# Altium PCB Master_Schematics.PcbDoc
Units mil, origin at the board's own origin, x right, y up, seen from the top; angles counter-clockwise.
Board outline 6000 x 4000 mil, 2 copper layers (Top Layer, Bottom Layer); 35 components, 38 nets, 463 pads, 0 vias.
Unrouted connection lines stored in the file: 74.
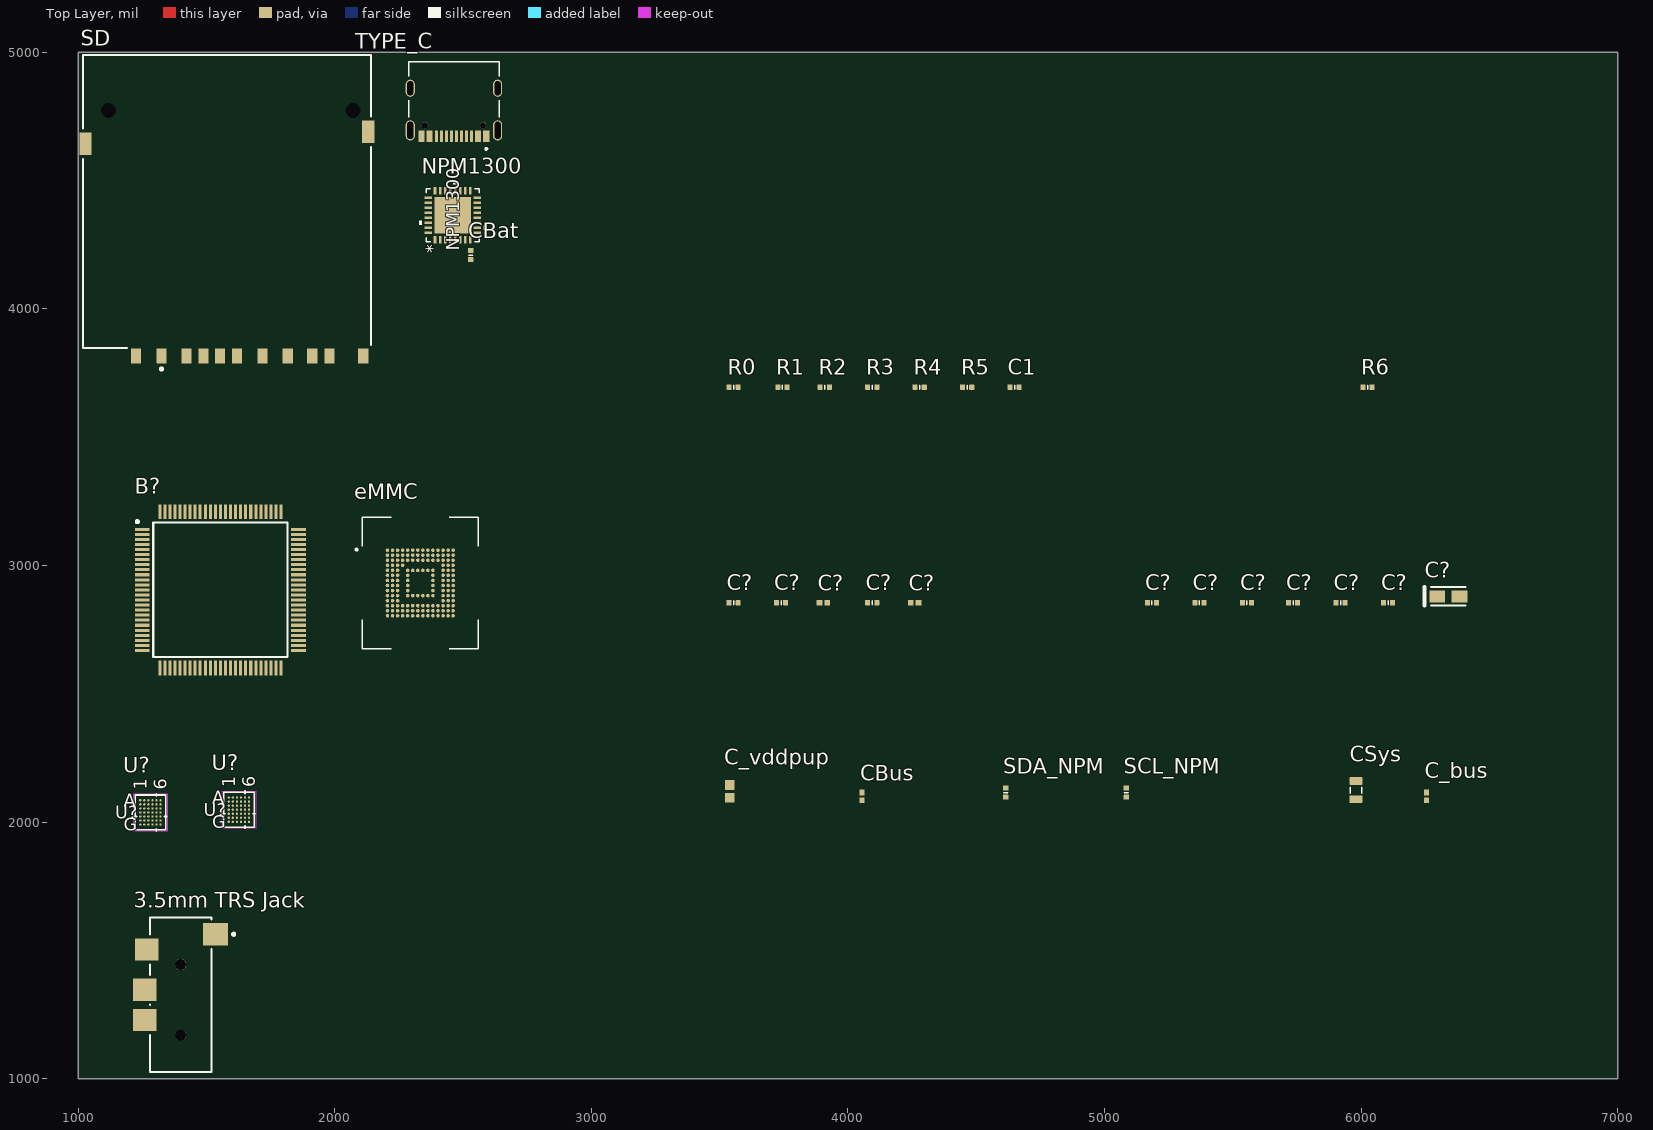
[diagram p0: Top Layer view]
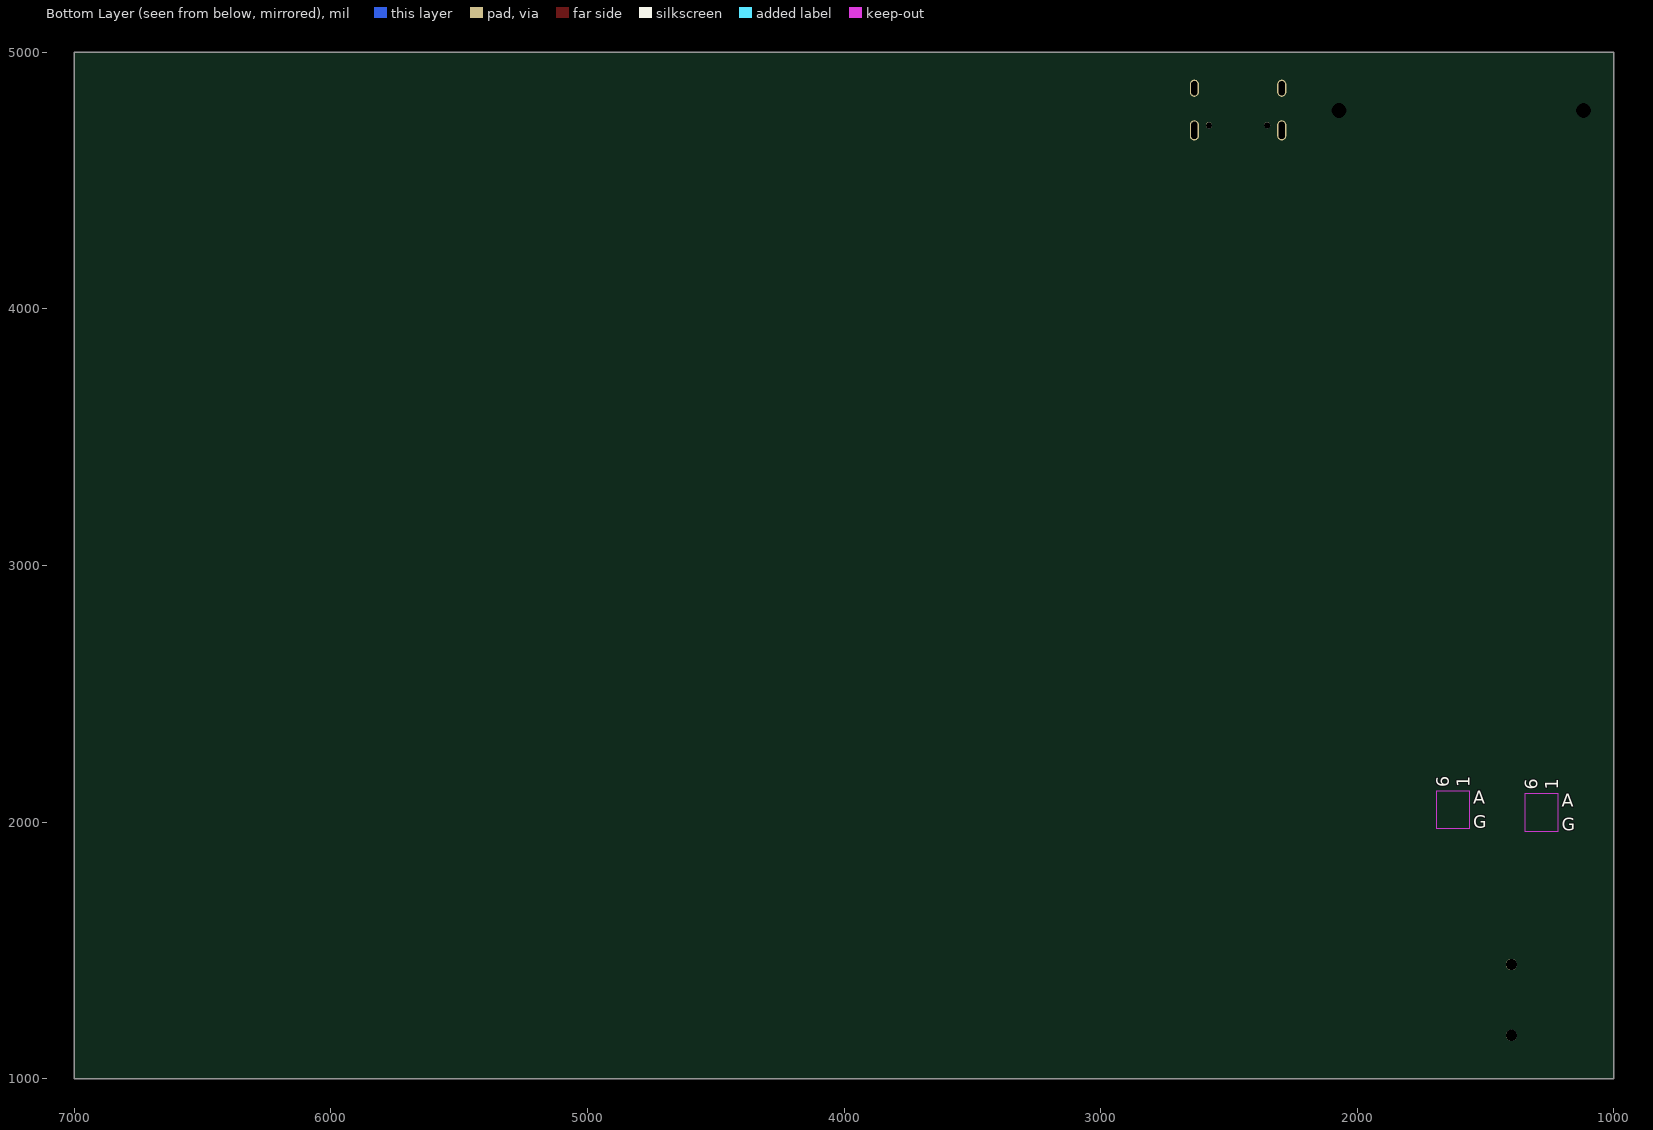
[diagram p1: Bottom Layer view, seen from below]

## Layer stack, top to bottom
Top Solder: solder mask 0.4, Solder Resist, Dk 3.5
Top Layer: signal copper 1.4
Dielectric 1: dielectric 12.6, FR-4, Dk 4.8
Bottom Layer: signal copper 1.4
Bottom Solder: solder mask 0.4, Solder Resist, Dk 3.5

## Board outline
1000,1000 7000,1000 7000,5000 1000,5000

## Design rules (kind name [scope] priority, off if disabled: settings)
Clearance [All] p1: gap=10 ignorepadtopadclearanceinfootprint=FALSE
PolygonConnect [All] p1: connectstyle=Relief reliefconductorwidth=10 reliefentries=4 polygonreliefangle="90 Angle" airgapwidth=10
RoutingVias [All] p1: holewidth=28 width=50 viastyle="Through Hole" minholewidth=28 minwidth=50 maxholewidth=28 maxwidth=50
SolderMaskExpansion [All] p1: expansion=0 istentingtop=FALSE
SupplyNets "Schematic Supply Nets_4" [InNet('VNET')] p1: voltage=0.000
SupplyNets "Schematic Supply Nets_3" [InNet('GND')] p2: voltage=0.000
SupplyNets "Schematic Supply Nets_2" [InNet('VDDIO')] p3: voltage=0.000
SupplyNets "Schematic Supply Nets_1" [InNet('VBUSIN')] p4: voltage=0.000
SupplyNets "Schematic Supply Nets" [InNet('VBAT')] p5: voltage=0.000
Width [All] p1: maxlimit=10 minlimit=10 preferedwidth=10
30 further rules are at their usual default settings.

## Classes and differential pairs
component class Designator: "3.5mm TRS Jack" U?

## Components (designator, comment, footprint, x,y, rotation, side; value= is the part's Value field where it differs from the comment)
"3.5mm TRS Jack" "SJ2-3574A-SMT-TR" FP-SJ2-3574A-SMT-TR-MFG 1400,1326.89 r90 top
B? "STM32H743VIT6" QFP50P1600X1600X160-100N 1555,2905 r0 top
C1 "Capacitor 100nF +/-20% 50V 0402" CAPC0402(1005)60_L 4650,3695 r0 top value=100nF
C? "Capacitor 1 uF +/- 10% 6.3 V 0402" CAPC1005X55X25LL05T10 3905,2855 r0 top value=1µF
C? "Capacitor 1 uF +/- 10% 6.3 V 0402" CAPC1005X55X25LL05T10 4260,2855 r0 top value=1µF
C? "Capacitor 100nF +/-20% 50V 0402" CAPC0402(1005)60_L 5370,2855 r0 top value=100nF
C? "Capacitor 100nF +/-20% 50V 0402" CAPC0402(1005)60_L 3740,2855 r0 top value=100nF
C? "Capacitor 100nF +/-20% 50V 0402" CAPC0402(1005)60_L 4095,2855 r0 top value=100nF
C? "Capacitor 100nF +/-20% 50V 0402" CAPC0402(1005)60_L 5185,2855 r0 top value=100nF
C? "Capacitor 100nF +/-20% 50V 0402" CAPC0402(1005)60_L 5555,2855 r0 top value=100nF
C? "Capacitor 100nF +/-20% 50V 0402" CAPC0402(1005)60_L 5920,2855 r0 top value=100nF
C? "Capacitor 100nF +/-20% 50V 0402" CAPC0402(1005)60_L 5735,2855 r0 top value=100nF
C? "Capacitor 100nF +/-20% 50V 0402" CAPC0402(1005)60_L 6105,2855 r0 top value=100nF
C? "Capacitor 100nF +/-20% 50V 0402" CAPC0402(1005)60_L 3555,2855 r0 top value=100nF
C? "TAJA475K016RNJ" AVX-TAJ-A-2_L 6340,2880 r0 top value=4.7µF
C_bus "Capacitor 1 uF +/- 10% 6.3 V 0402" CAPC1005X55X25LL05T10 6255,2100 r90 top value=1µF
C_vddpup "Capacitor 100 nF +/-10% 50 V 0603" CAPC1608X90X40NL10T20 3540,2120 r90 top value=100nF
CBat "Capacitor 2,2µF +/-20% 10V 0402" CAPC0402(1005)60_L 2530,4210 r90 top value=2.2µF
CBus "Capacitor 1 uF +/- 10% 6.3 V 0402" CAPC1005X55X25LL05T10 4055,2100 r90 top value=1µF
CSys "Capacitor 10µF +/-20% 25V 0805" CAPC0805(2012)145_L 5980,2125 r90 top value=10µF
eMMC "EMMC16G-TB29-90F01" BGA153N50P14X14_1300X1150X100N 2333.9,2932.05 r0 top
NPM1300 "NPM1300-QEAA-R7" QFN32_5X5_NOR 2460,4365 r90 top
R0 "10KR2F" RESC0402(1005)_L 3555,3695 r0 top value=10k
R1 "10KR2F" RESC0402(1005)_L 3745,3695 r0 top value=10k
R2 "10KR2F" RESC0402(1005)_L 3910,3695 r0 top value=10k
R3 "10KR2F" RESC0402(1005)_L 4095,3695 r0 top value=10k
R4 "10KR2F" RESC0402(1005)_L 4280,3695 r0 top value=10k
R5 "10KR2F" RESC0402(1005)_L 4465,3695 r0 top value=10k
R6 "10KR2F" RESC0402(1005)_L 6025,3695 r0 top value=10k
SCL_NPM "10KR2F" RESC0402(1005)_L 5085,2115 r90 top value=10k
SD "10067847-001RLF" FCI-10067847-001RLF_V 1580,4295 r180 top
SDA_NPM "10KR2F" RESC0402(1005)_L 4615,2115 r90 top value=10k
TYPE_C "TYPE-C-31-M-12" HRO_TYPE-C-31-M-12 2465,4860 r180 top
U? "CS43131-CWZR" WLCSP42_CS43131-CWZR_CIR 1627.13,2048.5 r0 top
U? "CS43131-CWZR" WLCSP42_CS43131-CWZR_CIR 1282.13,2037.76 r0 top

## Footprints (in the part's own frame and the unit in brackets; to place one, negate y for a bottom-side part, rotate by r counter-clockwise, add the part's x,y. Pads: shape width x height; smd on the part's side, far side on the other; paste and mask are expansions set on the pad)
AVX-TAJ-A-2_L [mm] "Molded Capacitor, 2-Leads, Body 3.4x1.8mm, IPC High Density"
  rect 1.55x1.2 smd: 1(-1.1,0) 2(1.1,0)
  silkscreen extent -2.37,-0.9 1.7,0.9, body extent -1.92,-0.9 1.92,0.9, height 1.8
BGA153N50P14X14_1300X1150X100N [mm]
  round 0.35 smd paste+0 mask+0.025: A1(-3.25,3.25) A2(-2.75,3.25) A3(-2.25,3.25) A4(-1.75,3.25) A5(-1.25,3.25) A6(-0.75,3.25) A7(-0.25,3.25) A8(0.25,3.25) A9(0.75,3.25) A10(1.25,3.25) A11(1.75,3.25) A12(2.25,3.25) A13(2.75,3.25) A14(3.25,3.25) B1(-3.25,2.75) B2(-2.75,2.75) B3(-2.25,2.75) B4(-1.75,2.75) B5(-1.25,2.75) B6(-0.75,2.75) B7(-0.25,2.75) B8(0.25,2.75) B9(0.75,2.75) B10(1.25,2.75) B11(1.75,2.75) B12(2.25,2.75) B13(2.75,2.75) B14(3.25,2.75) C1(-3.25,2.25) C2(-2.75,2.25) C3(-2.25,2.25) C4(-1.75,2.25) C5(-1.25,2.25) C6(-0.75,2.25) C7(-0.25,2.25) C8(0.25,2.25) C9(0.75,2.25) C10(1.25,2.25) C11(1.75,2.25) C12(2.25,2.25) C13(2.75,2.25) C14(3.25,2.25) D1(-3.25,1.75) D2(-2.75,1.75) D3(-2.25,1.75) D4(-1.75,1.75) D12(2.25,1.75) D13(2.75,1.75) D14(3.25,1.75) E1(-3.25,1.25) E2(-2.75,1.25) E3(-2.25,1.25) E5(-1.25,1.25) E6(-0.75,1.25) E7(-0.25,1.25) E8(0.25,1.25) E9(0.75,1.25) E10(1.25,1.25) E12(2.25,1.25) E13(2.75,1.25) E14(3.25,1.25) F1(-3.25,0.75) F2(-2.75,0.75) F3(-2.25,0.75) F5(-1.25,0.75) F10(1.25,0.75) F12(2.25,0.75) F13(2.75,0.75) F14(3.25,0.75) G1(-3.25,0.25) G2(-2.75,0.25) G3(-2.25,0.25) G5(-1.25,0.25) G10(1.25,0.25) G12(2.25,0.25) G13(2.75,0.25) G14(3.25,0.25) H1(-3.25,-0.25) H2(-2.75,-0.25) H3(-2.25,-0.25) H5(-1.25,-0.25) H10(1.25,-0.25) H12(2.25,-0.25) H13(2.75,-0.25) H14(3.25,-0.25) J1(-3.25,-0.75) J2(-2.75,-0.75) J3(-2.25,-0.75) J5(-1.25,-0.75) J10(1.25,-0.75) J12(2.25,-0.75) J13(2.75,-0.75) J14(3.25,-0.75) K1(-3.25,-1.25) K2(-2.75,-1.25) K3(-2.25,-1.25) K5(-1.25,-1.25) K6(-0.75,-1.25) K7(-0.25,-1.25) K8(0.25,-1.25) K9(0.75,-1.25) K10(1.25,-1.25) K12(2.25,-1.25) K13(2.75,-1.25) K14(3.25,-1.25) L1(-3.25,-1.75) L2(-2.75,-1.75) L3(-2.25,-1.75) L12(2.25,-1.75) L13(2.75,-1.75) L14(3.25,-1.75) M1(-3.25,-2.25) M2(-2.75,-2.25) M3(-2.25,-2.25) M4(-1.75,-2.25) M5(-1.25,-2.25) M6(-0.75,-2.25) M7(-0.25,-2.25) M8(0.25,-2.25) M9(0.75,-2.25) M10(1.25,-2.25) M11(1.75,-2.25) M12(2.25,-2.25) M13(2.75,-2.25) M14(3.25,-2.25) N1(-3.25,-2.75) N2(-2.75,-2.75) N3(-2.25,-2.75) N4(-1.75,-2.75) N5(-1.25,-2.75) N6(-0.75,-2.75) N7(-0.25,-2.75) N8(0.25,-2.75) N9(0.75,-2.75) N10(1.25,-2.75) N11(1.75,-2.75) N12(2.25,-2.75) N13(2.75,-2.75) N14(3.25,-2.75) P1(-3.25,-3.25) P2(-2.75,-3.25) P3(-2.25,-3.25) P4(-1.75,-3.25) P5(-1.25,-3.25) P6(-0.75,-3.25) P7(-0.25,-3.25) P8(0.25,-3.25) P9(0.75,-3.25) P10(1.25,-3.25) P11(1.75,-3.25) P12(2.25,-3.25) P13(2.75,-3.25) P14(3.25,-3.25)
  silkscreen extent -6.4,-6.5 5.75,6.5, body extent -5.75,-6.5 5.75,6.5, height 1
CAPC0402(1005)60_L [mm] "Chip Capacitor, Body 1.0x0.5mm, Height 0.6mm, IPC High Density"
  rrect25% 0.5x0.55 smd: 1(-0.45,0) 2(0.45,0)
  silkscreen extent 0,-0.2 0,0.2, body extent -0.5,-0.25 0.5,0.25, height 0.6
CAPC0805(2012)145_L [mm] "Chip Capacitor, Body 2.0x1.2mm, Height 1.45mm, IPC High Density"
  rrect25% 0.76x1.3 smd: 1(-0.9,0) 2(0.89,0)
  silkscreen extent -0.3,-0.55 0.3,0.55, body extent -1,-0.6 1,0.6, height 1.45
CAPC1005X55X25LL05T10 [mm] "Chip Capacitor, 2-Leads, Body 1.05x0.55mm, IPC High Density"
  rect 0.56x0.52 smd: 1(-0.39,0) 2(0.39,0)
  body extent -0.53,-0.28 0.53,0.28, height 0.55
CAPC1608X90X40NL10T20 [mm] "Chip Capacitor, 2-Leads, Body 1.70x0.90mm, IPC Medium Density"
  rect 0.95x0.95 smd: 1(-0.625,0) 2(0.625,0)
  body extent -0.85,-0.45 0.85,0.45, height 0.9
FCI-10067847-001RLF_V [mm] "CONN, 11-Leads, Body 29x28.5mm"
  rect 1x1.5 smd: 1(6.475,12.15) 2(3.975,12.15) 3(0.675,12.15) 4(-1.025,12.15) 5(-3.525,12.15) 6(-6.025,12.15) 7(-8.45,12.15) 8(-10.15,12.15) 9(8.975,12.15) 10(2.325,12.15) 11(-13.5,12.15)
  rect 1.2x2.2 smd: 12(-14,-10.05) 13(14,-8.85)
  round 0 hole 1.5 unplated: MH1(-12.5,-12.15) MH2(11.7,-12.15)
  silkscreen extent -14.25,-17.65 14.25,13.57, body extent -14.24,-17.7 14.21,12.56, height 2.9
FP-SJ2-3574A-SMT-TR-MFG [mm]
  rect 2.2x2.5 smd paste+0 mask+0: 1(6,-3.45)
  rect 2.2x2.3 smd paste+0 mask+0: 2(4.5,3.35) 3(0.5,3.55) 4(-2.5,3.55)
  round 1.1 hole 1.1 unplated paste-2539.97 mask+0: ""(-4,0) ""(3,0)
  silkscreen extent -7.65,-5.38 7.65,3.05, body extent -7.75,-4.8 7.75,4.8, height 0.25
HRO_TYPE-C-31-M-12 [mm]
  rect 0.6x1.14 smd mask+0.05: A1_B12(-3.2,4.75) A4_B9(-2.4,4.75) B1_A12(3.2,4.75) B4_A9(2.4,4.75)
  rect 0.3x1.14 smd mask+0.05: A5(-1.25,4.75) A6(-0.25,4.75) A7(0.25,4.75) A8(1.25,4.75) B5(1.75,4.75) B6(0.75,4.75) B7(-0.75,4.75) B8(-1.75,4.75)
  oval 0.9x2 hole 0.6 slot 1.7 at 90 deg: S1(-4.325,4.17) S2(4.325,4.17)
  oval 0.9x1.7 hole 0.6 slot 1.4 at 90 deg: S3(-4.325,0) S4(4.325,0)
  round 0.6 hole 0.6 unplated: ""(-2.89,3.68) ""(2.89,3.68)
  silkscreen extent -4.47,-2.6 4.47,6.1, body extent -4.47,-2.6 4.47,5.31, height 3.31
QFN32_5X5_NOR [mil]
  rect 30x10 smd paste+0 mask+0: 1(-95.5,68.9) 2(-95.5,49.21) 3(-95.5,29.53) 4(-95.5,9.84) 5(-95.5,-9.84) 6(-95.5,-29.53) 7(-95.5,-49.21) 8(-95.5,-68.9) 17(95.5,-68.9) 18(95.5,-49.21) 19(95.5,-29.53) 20(95.5,-9.84) 21(95.5,9.84) 22(95.5,29.53) 23(95.5,49.21) 24(95.5,68.9)
  rect 10x30 smd paste+0 mask+0: 9(-68.9,-95.5) 10(-49.21,-95.5) 11(-29.53,-95.5) 12(-9.84,-95.5) 13(9.84,-95.5) 14(29.53,-95.5) 15(49.21,-95.5) 16(68.9,-95.5) 25(68.9,95.5) 26(49.21,95.5) 27(29.53,95.5) 28(9.84,95.5) 29(-9.84,95.5) 30(-29.53,95.5) 31(-49.21,95.5) 32(-68.9,95.5)
  rect 142x142 smd paste-71 mask+0: 33(0,0)
  silkscreen extent -104,-130 130,130, body extent -99,-99 99,99, height 35
QFP50P1600X1600X160-100N [mm]
  rect 1.475x0.3 smd: 1(-7.738,6) 2(-7.738,5.5) 3(-7.738,5) 4(-7.738,4.5) 5(-7.738,4) 6(-7.738,3.5) 7(-7.738,3) 8(-7.738,2.5) 9(-7.738,2) 10(-7.738,1.5) 11(-7.738,1) 12(-7.738,0.5) 13(-7.738,0) 14(-7.738,-0.5) 15(-7.738,-1) 16(-7.738,-1.5) 17(-7.738,-2) 18(-7.738,-2.5) 19(-7.738,-3) 20(-7.738,-3.5) 21(-7.738,-4) 22(-7.738,-4.5) 23(-7.738,-5) 24(-7.738,-5.5) 25(-7.738,-6) 51(7.738,-6) 52(7.738,-5.5) 53(7.738,-5) 54(7.738,-4.5) 55(7.738,-4) 56(7.738,-3.5) 57(7.738,-3) 58(7.738,-2.5) 59(7.738,-2) 60(7.738,-1.5) 61(7.738,-1) 62(7.738,-0.5) 63(7.738,0) 64(7.738,0.5) 65(7.738,1) 66(7.738,1.5) 67(7.738,2) 68(7.738,2.5) 69(7.738,3) 70(7.738,3.5) 71(7.738,4) 72(7.738,4.5) 73(7.738,5) 74(7.738,5.5) 75(7.738,6)
  rect 0.3x1.475 smd: 26(-6,-7.738) 27(-5.5,-7.738) 28(-5,-7.738) 29(-4.5,-7.738) 30(-4,-7.738) 31(-3.5,-7.738) 32(-3,-7.738) 33(-2.5,-7.738) 34(-2,-7.738) 35(-1.5,-7.738) 36(-1,-7.738) 37(-0.5,-7.738) 38(0,-7.738) 39(0.5,-7.738) 40(1,-7.738) 41(1.5,-7.738) 42(2,-7.738) 43(2.5,-7.738) 44(3,-7.738) 45(3.5,-7.738) 46(4,-7.738) 47(4.5,-7.738) 48(5,-7.738) 49(5.5,-7.738) 50(6,-7.738) 76(6,7.738) 77(5.5,7.738) 78(5,7.738) 79(4.5,7.738) 80(4,7.738) 81(3.5,7.738) 82(3,7.738) 83(2.5,7.738) 84(2,7.738) 85(1.5,7.738) 86(1,7.738) 87(0.5,7.738) 88(0,7.738) 89(-0.5,7.738) 90(-1,7.738) 91(-1.5,7.738) 92(-2,7.738) 93(-2.5,7.738) 94(-3,7.738) 95(-3.5,7.738) 96(-4,7.738) 97(-4.5,7.738) 98(-5,7.738) 99(-5.5,7.738) 100(-6,7.738)
  silkscreen extent -8.35,-6.65 6.65,6.87
RESC0402(1005)_L [mm] "Chip Resistor, Body 1.0x0.5mm, IPC High Density"
  rrect25% 0.5x0.55 smd: 1(-0.45,0) 2(0.45,0)
  silkscreen extent 0,-0.2 0,0.2, body extent -0.5,-0.25 0.5,0.25, height 0.3
WLCSP42_CS43131-CWZR_CIR [mil]
  round 9 smd paste+0 mask+0: A1(-39.37,47.24) A2(-23.62,47.24) A3(-7.87,47.24) A4(7.87,47.24) A5(23.62,47.24) A6(39.37,47.24) B1(-39.37,31.5) B2(-23.62,31.5) B3(-7.87,31.5) B4(7.87,31.5) B5(23.62,31.5) B6(39.37,31.5) C1(-39.37,15.75) C2(-23.62,15.75) C3(-7.87,15.75) C4(7.87,15.75) C5(23.62,15.75) C6(39.37,15.75) D1(-39.37,0) D2(-23.62,0) D3(-7.87,0) D4(7.87,0) D5(23.62,0) D6(39.37,0) E1(-39.37,-15.75) E2(-23.62,-15.75) E3(-7.87,-15.75) E4(7.87,-15.75) E5(23.62,-15.75) E6(39.37,-15.75) F1(-39.37,-31.5) F2(-23.62,-31.5) F3(-7.87,-31.5) F4(7.87,-31.5) F5(23.62,-31.5) F6(39.37,-31.5) G1(-39.37,-47.24) G2(-23.62,-47.24) G3(-7.87,-47.24) G4(7.87,-47.24) G5(23.62,-47.24) G6(39.37,-47.24)
  Keep-Out Layer region: -64.74,-72.62 -64.74,72.62 64.74,72.62 64.74,-72.62
  silkscreen extent -64,-73 64,73, body extent -54,-63 54,63, height 21

## Part data
"3.5mm TRS Jack": library part CMP-14818-000001-1, "AUDIO JACK, 3.5 MM, RT, 4 CONDUC", Current Rating=1A, Manufacturer=CUI, Temperature="-25°C to +85°C", Temperature Range High=+85°C, Temperature Range Low=-25°C, Voltage Rating=12V, Automotive=No, Category=Conn, ComponentLink2Description=Datasheet, ComponentLink2URL=https://www.cui.com/product/resource/sj2-357x-smt.pdf, Conn Orientation=Horizontal, Contact Material=Silver, Device Class L1=Connectors, Device Class L2="Audio / Video Connectors", Device Class L3=unset, Digikey Description="AUDIO JACK, 3.5 MM, RT, 4 CONDUC", Height=5.3mm, Lead Free=Yes, Manufacturer Part Number=SJ2-3574A-SMT-TR, Number Of Contacts=4, Octopart=https://octopart.com/sj2-3574a-smt-tr-cui-77838840, Package=SJ2-3574A-SMT-TR, RoHS=TRUE
B?: library part CMP-060-000000-1, "ARM Microcontrollers - MCU High-performance and DSP with DP-FPU, ARM Cortex-M7 MCU with 2MBytes Flash, 1MB RAM, 400 MHz CPU, Art Accelerator, L1 cache, external memory interface, large set of peripherals", Manufacturer_Name=STMicroelectronics, Datasheet Link=https://www.st.com/resource/en/datasheet/stm32h743vi.pdf, Design Item ID=STM32H743VIT6, Geometry.Height=1.6mm, Manufacturer_Part_Number=STM32H743VIT6, Source=STM32H743VIT6.SchLib
C1 C? C? C? C? C? C? C? C? C?: library part CMP-001-00067-3, "Chip Capacitor, 100nF +/-20%, 50V, 0402, Thickness 0.6 mm", Case/Package=0402, Max Operating Temperature=85°C, Min Operating Temperature=-55°C, Tolerance=10%, Voltage Rating=50V, Mounting Technology=SMT, Pins=2
C? C? C_bus CBus: library part CMP-001-00008-6, "Chip Capacitor, 1 uF, +/- 10%, 6.3 V, 0402 (1005 Metric)", Capacitor Type=Ceramic, Case/Package=0402, Max Operating Temperature=85°C, Min Operating Temperature=-55°C, Tolerance=10%, Voltage Rating=6.3V, Mounting Technology=SM, Pins=2, RoHS Compliant=True
C?: library part CMP-001-00042-7, "Standard Tantalum, 4.7 uF, +/- 10%, 16 V, -55 to 125 degC, 1206 (3216 Metric), RoHS, Tape and Reel", Capacitor Type=Tantalum, Case/Package=1206, Manufacturer=AVX, Max Operating Temperature=125°C, Min Operating Temperature=-55°C, Package Description="2-Pin Surface Mount Device, Body 3.2 x 1.65 mm", Package Quantity=2000, Package Reference=TAJ-A-2, Resistance=4Ohm, Tolerance=10%, Voltage Rating=16V, Datasheet URL=http://datasheets.avx.com/TAJ.pdf, Datasheet Version=Feb-16, ESR=4Ohm, Manufacturer URL=http://www.avx.com/, Mounting Technology=SM, Packaging=TapeandReel, Pins=2, RoHS Compliant=True
C_vddpup: library part CMP-001-00017-6, "Chip Capacitor, 100 nF, +/- 10%, 50 V, 0603 (1608 Metric)", Capacitor Type=Ceramic, Case/Package=0603, Max Operating Temperature=125°C, Min Operating Temperature=-55°C, Tolerance=10%, Voltage Rating=50V, Mounting Technology=SM, Pins=2, RoHS Compliant=True
CBat: library part CMP-001-00056-4, "Chip Capacitor, 2,2µF +/-20%, 10V, 0402, Thickness 0.6 mm", Case/Package=0402, Max Operating Temperature=85°C, Min Operating Temperature=-55°C, Tolerance=10%, Voltage Rating=10V, Mounting Technology=SMT, Pins=2
CSys: library part CMP-001-00079-4, "Chip Capacitor, 10µF +/-20%, 25V, 0805, Thickness 1.45 mm", Case/Package=0805, Max Operating Temperature=85°C, Min Operating Temperature=-55°C, Tolerance=10%, Voltage Rating=25V, Mounting Technology=SMT, Pins=2
eMMC: library part CMP-054-000000-1, "eMMC 5.1 (HS400) 153B 16GB", Package=None, Check_prices=https://www.snapeda.com/parts/EMMC16G-TB29-90F01/Kingston/view-part/?ref=eda, Component Type=Standard, Design Item ID=EMMC16G-TB29-90F01, MF=Kingston, MP=EMMC16G-TB29-90F01, Pin Count=153, SnapEDA_Link=https://www.snapeda.com/parts/EMMC16G-TB29-90F01/Kingston/view-part/?ref=snap, Source=EMMC16G-TB29-90F01.SchLib
NPM1300: library part CMP-052-000000-1, "Description", Manufacturer_Name="Nordic Semiconductor", Copyright="Copyright (C) 2026 Ultra Librarian. All rights reserved.", Design Item ID=NPM1300-QEAA-R7, Manufacturer_Part_Number=NPM1300-QEAA-R7, RefDes=RefDes, Source=NPM1300-QEAA-R7.SchLib, Type=Type
R0 R1 R2 R3 R4 R5 R6 SCL_NPM SDA_NPM: library part CMP-009-00066-2, "10K 0.063W 1% 0402 (1005 Metric)  SMD", Case/Package=0402, Power=63mW, Tolerance=1%, Mounting Technology=SMT, Pins=2
SD: library part CMP-2000-05818-1, "Assembly SD Card Reader, Famale, 11 Way, -40 to 105 degC, RoHS, Tape and Reel", Manufacturer="FCI Electronics", Package Description="11-Pin Surface Mount Device, Body 29 x 28.5 mm", Connector Type=MemoryCard, Contact Material=CopperAlloy, Contact Plating=GoldPlatedContacts, Datasheet URL=https://datasheet.ciiva.com/1106/10067847-1106690.pdf, Datasheet Version="Rev. K, 09/2014", Manufacturer URL=http://portal.fciconnect.com/, Mounting Technology=SurfaceMount, No. of Contacts=11Contacts, Package Reference=10067847-001RLF, Product Range=-, SVHC=NoSVHC(15-Jun-2015)
TYPE_C: library part CMP-027-000000-1, "USB Connectors 24 Receptacle 1 8.94*7.3mm RoHS", Package=Package, Check_prices=https://www.snapeda.com/parts/TYPE-C-31-M-12/HRO+Electronics+Co.%252C+Ltd./view-part/?ref=eda, Component Type=Standard, Design Item ID=TYPE-C-31-M-12, MF="HRO Electronics Co., Ltd.", MP=TYPE-C-31-M-12, Pin Count=16, SnapEDA_Link=https://www.snapeda.com/parts/TYPE-C-31-M-12/HRO+Electronics+Co.%252C+Ltd./view-part/?ref=snap, Source=TYPE-C-31-M-12.SchLib
U? U?: library part CMP-057-000000-1, "Description", Manufacturer_Name="Cirrus Logic", Copyright="Copyright (C) 2025 Ultra Librarian. All rights reserved.", Design Item ID=CS43131-CWZR, Manufacturer_Part_Number=CS43131-CWZR, RefDes=RefDes, Source=CS43131-CWZR.SchLib, Type=Type

## Nets (pads, with @x,y where several pads share a name; then routed paths per layer and width w, separated by ;. In a path a pad name is that pad's centre, name@x,y a point inside that pad or via, vN(x,y) a via of type N, cw(c..) or ccw(c..) an arc to the next point about the centre after c; other vN are vias at no path point)
CBUS_V: C_bus.1 NPM1300.22
CC1: NPM1300.23 TYPE_C.A5
CC2: NPM1300.24 TYPE_C.B5
GND: C1.2 C_bus.2 C_vddpup.1 CBat.2 CBus.1 CSys.1 eMMC.A6 eMMC.C4 eMMC.E7 eMMC.G5 eMMC.H10 eMMC.J5 eMMC.K8 eMMC.N2 eMMC.N5 eMMC.P4 eMMC.P6 NPM1300.2 NPM1300.6 NPM1300.18 NPM1300.28 NPM1300.29 NPM1300.30 NPM1300.31 NPM1300.33 SD.3 SD.6 SD.11 SD.12 SD.13 TYPE_C.A1_B12 TYPE_C.A8 TYPE_C.B1_A12 TYPE_C.B8 TYPE_C.S1 TYPE_C.S2 TYPE_C.S3 TYPE_C.S4
NetB?_16: B?.16
NetB?_22: B?.22
NetB?_53: B?.53
NetB?_54: B?.54
NetB?_65: B?.65
NetB?_66: B?.66
NetB?_78: B?.78
NetB?_79: B?.79
NetB?_80: B?.80
NetB?_83: B?.83
NetB?_89: B?.89
NetB?_90: B?.90
NeteMMC_A3: eMMC.A3
NeteMMC_A4: eMMC.A4
NeteMMC_A5: eMMC.A5
NeteMMC_B2: eMMC.B2
NeteMMC_K5: eMMC.K5
NeteMMC_M5: eMMC.M5
NeteMMC_M6: eMMC.M6
NetNPM1300_13: NPM1300.13 SDA_NPM.2
NetNPM1300_14: NPM1300.14 SCL_NPM.2
NetR3_2: R3.2 SD.5
NetR6_1: R6.1 SD.10
SD_CMD: R4.2 SD.2
SD_DAT0: R2.2 SD.7
SD_DAT1: R1.2 SD.8
SD_DAT2: R0.2 SD.9
SD_DAT3: R5.2 SD.1
V1V8: eMMC.C6 eMMC.M4 eMMC.N4 eMMC.P3 eMMC.P5 R6.2
V3V3: C1.1 eMMC.E6 eMMC.F5 eMMC.J10 eMMC.K9 R0.1 R1.1 R2.1 R3.1 R4.1 R5.1 SD.4
VBAT: CBat.1 NPM1300.19
VBUSIN: CBus.2 NPM1300.21
VDDIO: C_vddpup.2 NPM1300.12 SCL_NPM.1 SDA_NPM.1
VNET: CSys.2 NPM1300.1 NPM1300.4 NPM1300.20 NPM1300.32
pads on no net: "3.5mm TRS Jack.1" "3.5mm TRS Jack.2" "3.5mm TRS Jack.3" "3.5mm TRS Jack.4" "3.5mm TRS Jack." B?.1 B?.2 B?.3 B?.4 B?.5 B?.6 B?.7 B?.8 B?.9 B?.10 B?.11 B?.12 B?.13 B?.14 B?.15 B?.17 B?.18 B?.19 B?.20 B?.21 B?.23 B?.24 B?.25 B?.26 B?.27 B?.28 B?.29 B?.30 B?.31 B?.32 B?.33 B?.34 B?.35 B?.36 B?.37 B?.38 B?.39 B?.40 B?.41 B?.42 B?.43 B?.44 B?.45 B?.46 B?.47 B?.48 B?.49 B?.50 B?.51 B?.52 B?.55 B?.56 B?.57 B?.58 B?.59 B?.60 B?.61 B?.62 B?.63 B?.64 B?.67 B?.68 B?.69 B?.70 B?.71 B?.72 B?.73 B?.74 B?.75 B?.76 B?.77 B?.81 B?.82 B?.84 B?.85 B?.86 B?.87 B?.88 B?.91 B?.92 B?.93 B?.94 B?.95 B?.96 B?.97 B?.98 B?.99 B?.100 C?.1 C?.2 eMMC.A1 eMMC.A2 eMMC.A7 eMMC.A8 eMMC.A9 eMMC.A10 eMMC.A11 eMMC.A12 eMMC.A13 eMMC.A14 eMMC.B1 eMMC.B3 eMMC.B4 eMMC.B5 eMMC.B6 eMMC.B7 eMMC.B8 eMMC.B9 eMMC.B10 eMMC.B11 eMMC.B12 eMMC.B13 eMMC.B14 eMMC.C1 eMMC.C2 eMMC.C3 eMMC.C5 eMMC.C7 eMMC.C8 eMMC.C9 eMMC.C10 eMMC.C11 eMMC.C12 eMMC.C13 eMMC.C14 eMMC.D1 eMMC.D2 eMMC.D3 eMMC.D4 eMMC.D12 eMMC.D13 eMMC.D14 eMMC.E1 eMMC.E2 eMMC.E3 eMMC.E5 eMMC.E8 eMMC.E9 eMMC.E10 eMMC.E12 eMMC.E13 eMMC.E14 eMMC.F1 eMMC.F2 eMMC.F3 eMMC.F10 eMMC.F12 eMMC.F13 eMMC.F14 eMMC.G1 eMMC.G2 eMMC.G3 eMMC.G10 eMMC.G12 eMMC.G13 eMMC.G14 eMMC.H1 eMMC.H2 eMMC.H3 eMMC.H5 eMMC.H12 eMMC.H13 eMMC.H14 eMMC.J1 eMMC.J2 eMMC.J3 eMMC.J12 eMMC.J13 eMMC.J14 eMMC.K1 eMMC.K2 eMMC.K3 eMMC.K6 eMMC.K7 eMMC.K10 eMMC.K12 eMMC.K13 eMMC.K14 eMMC.L1 eMMC.L2 eMMC.L3 eMMC.L12 eMMC.L13 eMMC.L14 eMMC.M1 eMMC.M2 eMMC.M3 eMMC.M7 eMMC.M8 eMMC.M9 eMMC.M10 eMMC.M11 eMMC.M12 eMMC.M13 eMMC.M14 eMMC.N1 eMMC.N3 eMMC.N6 eMMC.N7 eMMC.N8 eMMC.N9 eMMC.N10 eMMC.N11 eMMC.N12 eMMC.N13 eMMC.N14 eMMC.P1 eMMC.P2 eMMC.P7 eMMC.P8 eMMC.P9 eMMC.P10 eMMC.P11 eMMC.P12 eMMC.P13 eMMC.P14 NPM1300.3 NPM1300.5 NPM1300.7 NPM1300.8 NPM1300.9 NPM1300.10 NPM1300.11 NPM1300.15 NPM1300.16 NPM1300.17 NPM1300.25 NPM1300.26 NPM1300.27 SD.MH1 SD.MH2 TYPE_C. TYPE_C.A4_B9 TYPE_C.A6 TYPE_C.A7 TYPE_C.B4_A9 TYPE_C.B6 TYPE_C.B7 U?.A1 U?.A2 U?.A3 U?.A4 U?.A5 U?.A6 U?.B1 U?.B2 U?.B3 U?.B4 U?.B5 U?.B6 U?.C1 U?.C2 U?.C3 U?.C4 U?.C5 U?.C6 U?.D1 U?.D2 U?.D3 U?.D4 U?.D5 U?.D6 U?.E1 U?.E2 U?.E3 U?.E4 U?.E5 U?.E6 U?.F1 U?.F2 U?.F3 U?.F4 U?.F5 U?.F6 U?.G1 U?.G2 U?.G3 U?.G4 U?.G5 U?.G6

## Text inside footprints (layer, text, board x,y; h text height)
NPM1300: Top 3D Body "*" at 2406.26,4272 h50 r90; Top Overlay "*" at 2406.26,4217 h50 r90
TYPE_C: Top 3D Body "PCB EDGE" at 2260.28,4934.8 h24 r180
U?: Top 3D Body "A" at 1178.13,2060 h50; Top 3D Body "G" at 1178.13,1965.51 h50; Top 3D Body "1" at 1267.76,2125.76 h50 r90; Top 3D Body "6" at 1346.5,2125.76 h50 r90; Top Overlay "A" at 1178.13,2060 h50; Top Overlay "G" at 1178.13,1965.51 h50; Top Overlay "1" at 1267.76,2125.76 h50 r90; Top Overlay "6" at 1346.5,2125.76 h50 r90; Bottom Overlay "A" at 1203.13,2060 h50; Bottom Overlay "G" at 1203.13,1965.51 h50; Bottom Overlay "1" at 1217.76,2125.76 h50 r270; Bottom Overlay "6" at 1296.5,2125.76 h50 r270
U?: Top 3D Body "6" at 1691.5,2136.5 h50 r90; Top 3D Body "1" at 1612.76,2136.5 h50 r90; Top 3D Body "G" at 1523.13,1976.26 h50; Top 3D Body "A" at 1523.13,2070.75 h50; Top Overlay "6" at 1691.5,2136.5 h50 r90; Top Overlay "1" at 1612.76,2136.5 h50 r90; Top Overlay "G" at 1523.13,1976.26 h50; Top Overlay "A" at 1523.13,2070.75 h50; Bottom Overlay "6" at 1641.5,2136.5 h50 r270; Bottom Overlay "1" at 1562.76,2136.5 h50 r270; Bottom Overlay "G" at 1548.13,1976.26 h50; Bottom Overlay "A" at 1548.13,2070.75 h50